# Altium PCB NeoLink Basic Main Board.PcbDoc (part 2 of 5)
Units mm, origin at the board's own origin, x right, y up, seen from the top; angles counter-clockwise.
Board outline 70 x 115 mm, 6 copper layers (Top Layer, Layer 2, Layer 3, Layer 4, Layer 5, Bottom Layer), stack 1.148 mm thick; 467 components, 265 nets, 1397 pads, 1169 vias.
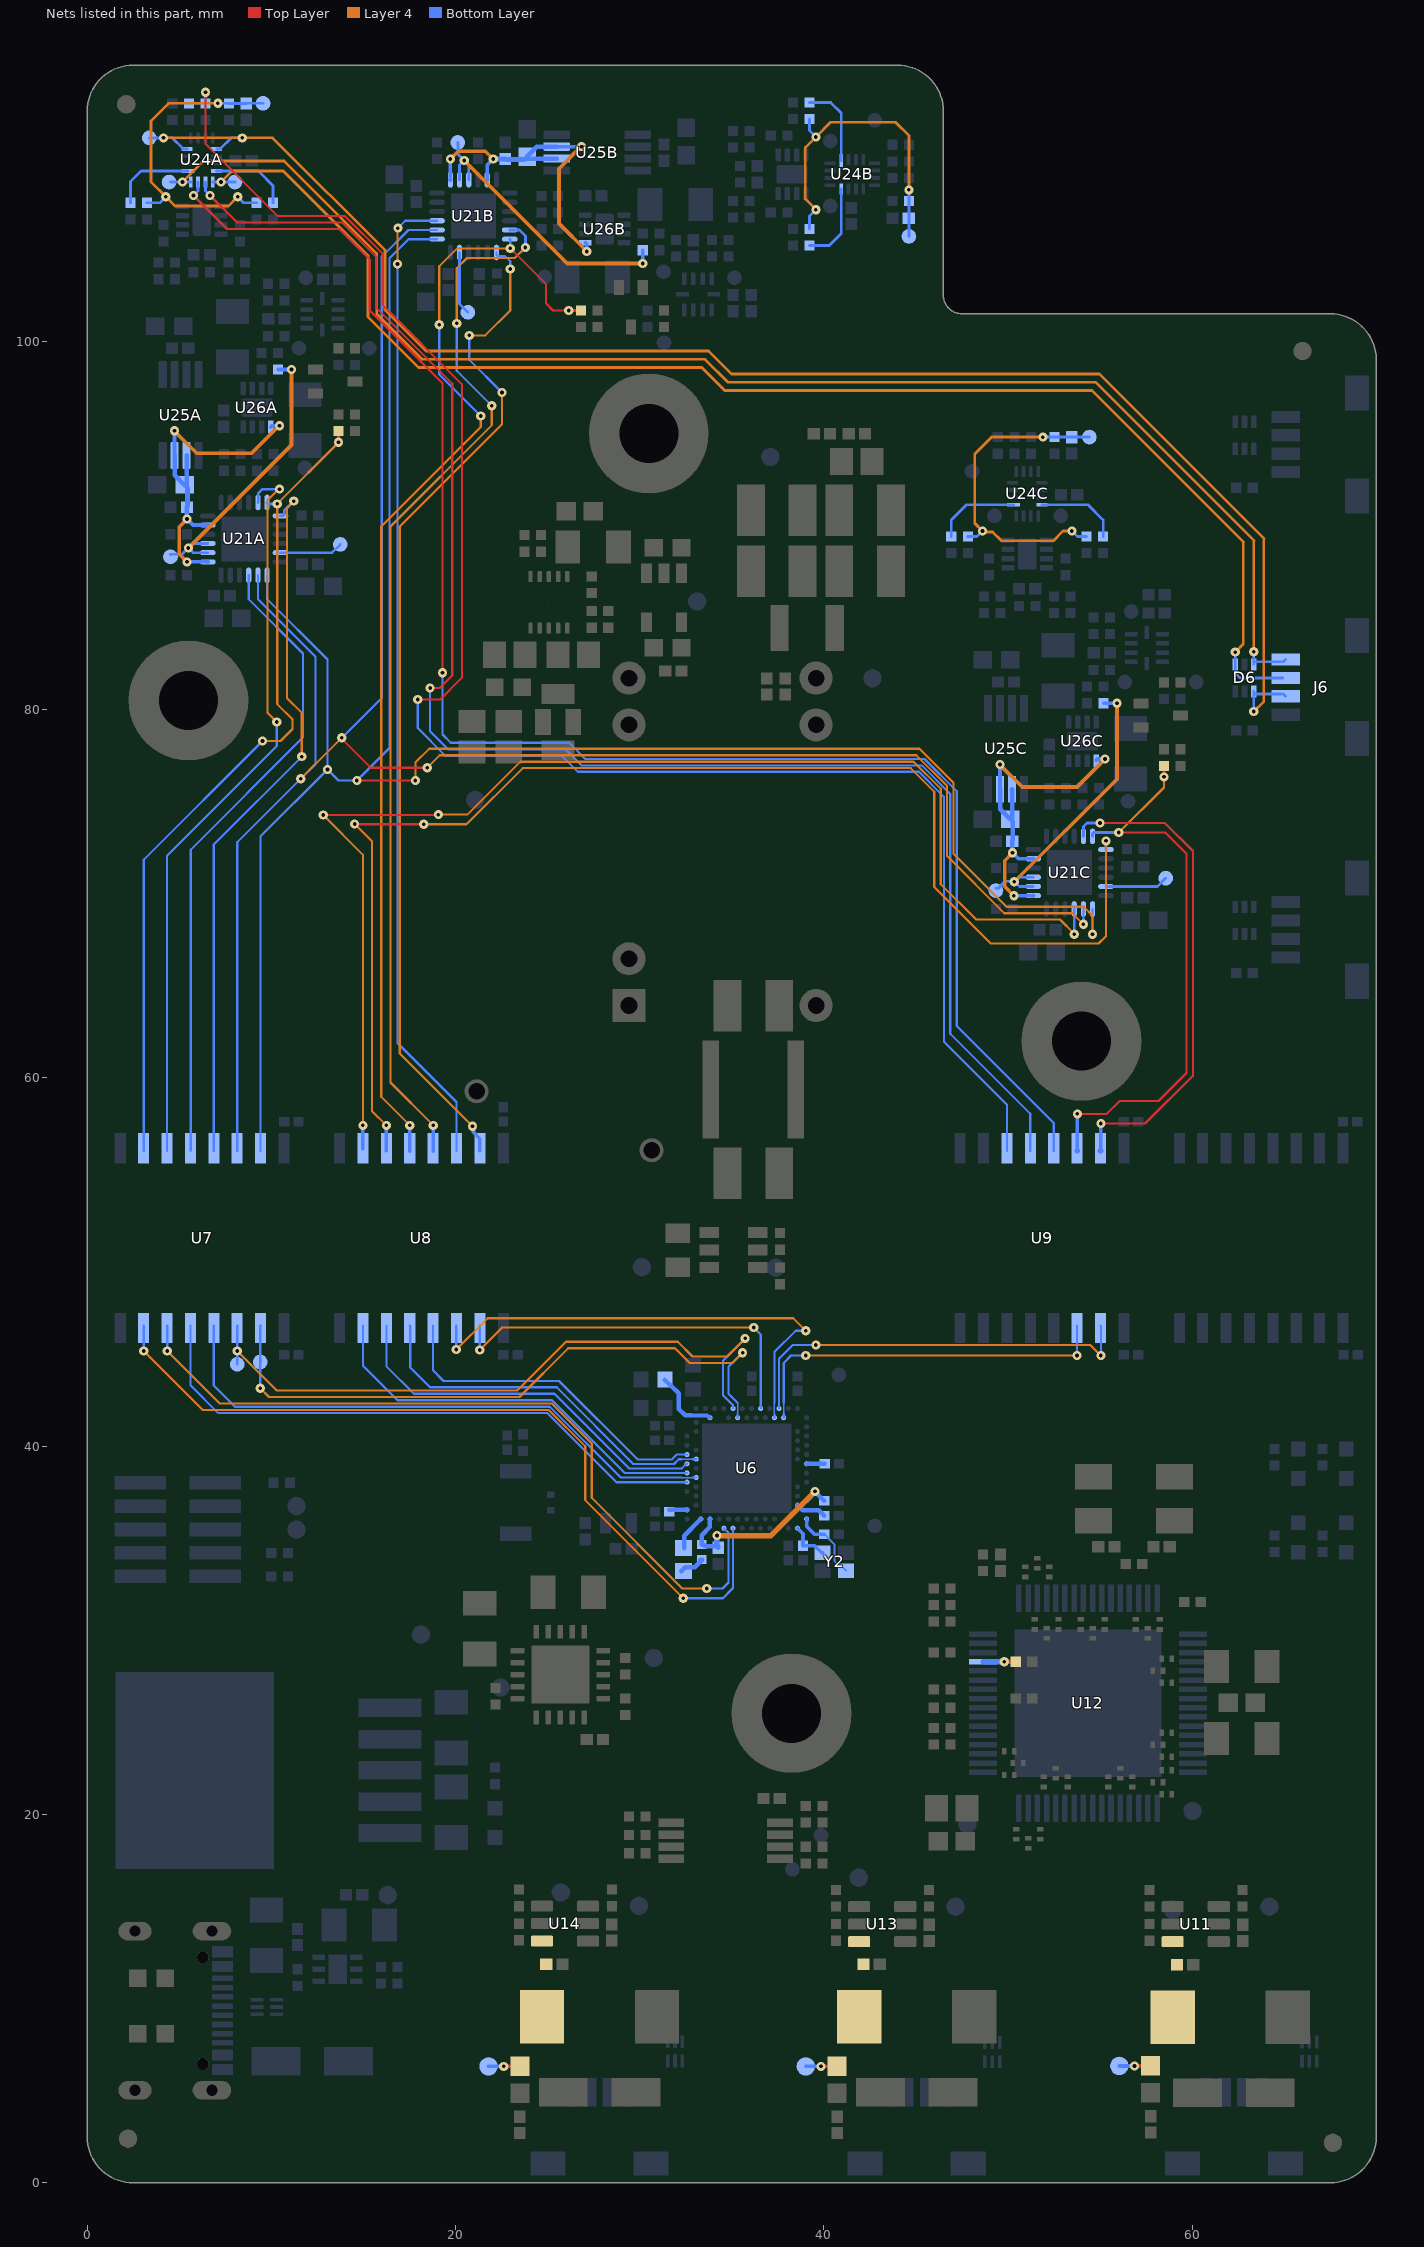
[diagram p6: the nets of this part, all layers, seen from the top]

## Footprints (in the part's own frame and the unit in brackets; to place one, negate y for a bottom-side part, rotate by r counter-clockwise, add the part's x,y. Pads: shape width x height; smd on the part's side, far side on the other; paste and mask are expansions set on the pad) (continued)
"Capgemini Copper Logo - Large" [mm] "Capgemini Copper Logo - Large"
  Top Layer region: 1.841,0.259 1.832,0.259 1.832,0.269 1.841,0.269
  Top Layer region: 1124 vertices and 0 holes, not listed, extent -2,-1.414 1.832,1.867
  Top Layer region: 733 vertices and 0 holes, not listed, extent -0.626,-1.75 1.916,0.315
  Top Layer pour cut-out: -2.25,-2 2.112,-2 2.112,2.117 -2.25,2.117
ECMF240A100N6 [mm]
  rect 0.7x0.2 smd mask+0.05: 1(-0.525,0.4) 2(-0.525,0) 3(-0.525,-0.4) 4(0.525,-0.4) 5(0.525,0) 6(0.525,0.4)
  silkscreen extent -1.2,0.35 -1.1,0.45, body extent -0.71,-0.72 0.71,0.72, height 0.51
FB-0402-L [mm] "Ferrite Bead/Inductor 0402, IPC High Density"
  rect 0.49x0.52 smd mask+0.05: 1(-0.405,0) 2(0.405,0)
  body extent -0.5,-0.25 0.5,0.25, height 0.5
FB-0603-L [mm] "Ferrite Bead/Inductor 0603, IPC High Density"
  rect 0.86x0.92 smd mask+0.05: 1(-0.625,0) 2(0.625,0)
  body extent -0.8,-0.4 0.8,0.4, height 0.8
FB-0603-N [mm] "Ferrite Bead/Inductor 0603, IPC Medium Density"
  rect 1.06x1.02 smd mask+0.05: 1(-0.725,0) 2(0.725,0)
  body extent -0.8,-0.4 0.8,0.4, height 0.8
FEEDTHROUGH-1206 [mil]
  rect 41.78x71 smd paste+0 mask+1.97: 1(-59.89,0) 3(59.89,0)
  rect 55x33.78 smd paste+0 mask+1.97: 2(0,-32.39) 4(0,32.39)
  silkscreen extent -103,-49 67,49, body extent -91,-55 91,55, height 10
FIDUCIAL-1MM [mm] "Fiducial 1mm"
  round 1 smd paste-0.5 mask+0.5: ""(0,0)
  Top Layer pour cut-out: 1.1,0 1.1,0.108 1.058,0.321 0.975,0.521 0.854,0.701 0.701,0.854 0.521,0.975 0.321,1.058 0.108,1.1 0,1.1 -0.108,1.1 -0.321,1.058 -0.521,0.975 -0.701,0.854 -0.854,0.701 -0.975,0.521 -1.058,0.321 -1.1,0.108 -1.1,0 -1.1,-0.108 -1.058,-0.321 -0.975,-0.521 -0.854,-0.701 -0.701,-0.854 -0.521,-0.975 -0.321,-1.058 -0.108,-1.1 0,-1.1 0.108,-1.1 0.321,-1.058 0.521,-0.975 0.701,-0.854 0.854,-0.701 0.975,-0.521 1.058,-0.321 1.1,-0.108 1.1,0
FP-DGK0008A-MFG [mm]
  rrect25% 1.45x0.45 smd paste+0 mask+0.05: 1(-2.2,0.975) 2(-2.2,0.325) 3(-2.2,-0.325) 4(-2.2,-0.975) 5(2.2,-0.975) 6(2.2,-0.325) 7(2.2,0.325) 8(2.2,0.975)
  silkscreen extent -2.32,-1.55 1.1,1.82, body extent -2.45,-1.5 2.45,1.5, height 1.1
FP-DRL0006A-MFG [mm]
  rrect20% 0.66x0.31 smd mask+0.05: 1(-0.735,0.5) 2(-0.735,0) 3(-0.735,-0.5) 4(0.735,-0.5) 5(0.735,0) 6(0.735,0.5)
  silkscreen extent -0.97,0.9 -0.5,0.9, body extent -0.8,-0.8 0.8,0.8, height 0.6
FP-DSC0010J-MFG [mm]
  rrect42% 0.6x0.24 smd paste+0 mask+0.05: 1(-1.4,1) 2(-1.4,0.5) 3(-1.4,0) 4(-1.4,-0.5) 5(-1.4,-1) 6(1.4,-1) 7(1.4,-0.5) 8(1.4,0) 9(1.4,0.5) 10(1.4,1)
  round 0.025 smd paste-2539.97 mask+0.05: 11(0,0)
  silkscreen extent -1.55,-1.55 1.55,1.55, body extent -1.5,-1.5 1.5,1.5, height 0.8
FTSH-105-01-X-DV-K [mm] "Samtec FTSH-105-01-X-DV-K"
  rect 0.74x2.79 smd: 1(-2.54,-2.035) 2(-2.54,2.035) 3(-1.27,-2.035) 4(-1.27,2.035) 5(0,-2.035) 6(0,2.035) 7(1.27,-2.035) 8(1.27,2.035) 9(2.54,-2.035) 10(2.54,2.035)
  silkscreen extent -3.92,-2.13 3.26,1.72, body extent -3.19,-2.96 3.16,2.88, height 6.12
"GCT USB4105-GF-A" [mm] "GCT USB4105-GF-A"
  rect 0.6x1.15 smd mask+0.05: A1_B12(-3.2,4.755) A4_B9(-2.4,4.755) B1_A12(3.2,4.755) B4_A9(2.4,4.755)
  rect 0.3x1.15 smd mask+0.05: A5(-1.25,4.755) A6(-0.25,4.755) A7(0.25,4.755) A8(1.25,4.755) B5(1.75,4.755) B6(0.75,4.755) B7(-0.75,4.755) B8(-1.75,4.755)
  oval 1x2.1 hole 0.6 slot 1.7 at 90 deg mask+0.05: SH1(-4.32,4.18) SH2(4.32,4.18)
  oval 1x1.8 hole 0.6 slot 1.4 at 90 deg mask+0.05: SH3(-4.32,0) SH4(4.32,0)
  round 0.65 hole 0.65 unplated mask+0.05: ""(-2.89,3.68) ""(2.89,3.68)
  silkscreen extent -4.47,-1.95 4.47,6.1, body extent -4.47,-2.6 4.47,5.1, height 3.27
JEDEC-DO-214AC-N [mm] "SMA Diode, IPC Media Density"
  rect 2.65x1.55 smd mask+0.05: A(1.975,0) K(-1.975,0)
  silkscreen extent -3.57,-1.5 2.35,1.5, body extent -2.6,-1.3 2.6,1.3, height 2.9
JEDEC-SOT-23-6-N [mm] "SOT-23-6 (MO-178) (SC-74), IPC Medium Density"
  rect 1.05x0.6 smd mask+0.05: 1(-1.325,0.95) 2(-1.325,0) 3(-1.325,-0.95) 4(1.325,-0.95) 5(1.325,0) 6(1.325,0.95)
  silkscreen extent -1.45,-1.45 0.4,1.92, body extent -1.41,-1.45 1.41,1.45, height 1.46
KTT0005A [mm] "DPAK, 5-Leads, Body 10.65x9.65mm, Pitch 1.7mm, IPC Medium Density"
  rect 1x3.4 smd paste-1.687 mask+0: 1(-3.4,-6.6) 2(-1.7,-6.6) 3(0,-6.6) 4(1.7,-6.6) 5(3.4,-6.6)
  rect 10.7x8.6 smd paste-5.337 mask+0: 6(0,4)
  silkscreen extent -5.34,-6.73 5.34,-0.67, body extent -5.08,-7.65 5.08,7.62, height 4.59
"Label Box, Rectangle, 6mm x 20mm" [mm] "Label Box, Rectangle, 6mm x 20mm"
  silkscreen extent -10.05,-3.05 10.05,3.05
LED-0603-GREEN [mm] "LED, 0603, Green"
  rect 0.8x0.8 smd mask+0.05: A(-0.8,0) K(0.8,0)
  silkscreen extent 0.8,-0.7 1.5,0.7, body extent -0.8,-0.4 0.8,0.4, height 1
LQW32-1210 [mm] "Murata Electronics LQW32 1210"
  rect 1x2.5 smd mask+0.05: 1(-1.5,0) 2(1.5,0)
  silkscreen extent -0.6,-1.25 0.6,1.25, body extent -1.6,-1.25 1.6,1.25, height 2.3
MLCC-0201-N [mm] "Ceramic Capacitor 0201, IPC Medium Density"
  rect 0.25x0.35 smd mask+0.05: 1(-0.275,0) 2(0.275,0)
  body extent -0.3,-0.15 0.3,0.15, height 0.3
MLCC-0402-L [mm] "Ceramic Capacitor 0402, IPC High Density"
  rect 0.56x0.52 smd mask+0.05: 1(-0.39,0) 2(0.39,0)
  body extent -0.5,-0.25 0.5,0.25, height 0.55
MLCC-0402-N [mm] "Ceramic Capacitor 0402, IPC Medium Density"
  rect 0.66x0.62 smd mask+0.05: 1(-0.44,0) 2(0.44,0)
  body extent -0.5,-0.25 0.5,0.25, height 0.55
MLCC-0603-L [mm] "Ceramic Capacitor 0603, IPC HIgh Density"
  rect 0.8x0.85 smd mask+0.05: 1(-0.65,0) 2(0.65,0)
  body extent -0.8,-0.4 0.8,0.4, height 0.9
MLCC-0603-N [mm] "Ceramic Capacitor 0603, IPC Medium Density"
  rect 1x0.95 smd mask+0.05: 1(-0.75,0) 2(0.75,0)
  body extent -0.8,-0.4 0.8,0.4, height 0.9
MLCC-0805-N [mm] "Ceramic Capacitor 0805, IPC Medium Density"
  rect 1.25x1.45 smd mask+0.05: 1(-0.825,0) 2(0.825,0)
  body extent -1,-0.62 1,0.63, height 1.35
MLCC-1206-N [mm] "Ceramic Capacitor 1206, IPC Medium Density"
  rect 1.35x1.8 smd mask+0.05: 1(-1.375,0) 2(1.375,0)
  silkscreen extent -0.3,-0.8 0.3,0.8, body extent -1.6,-0.8 1.6,0.8, height 1.8
MLCC-1210-N [mm] "Ceramic Capacitor 1210, IPC Medium Density"
  rect 1.5x2.8 smd mask+0.05: 1(-1.4,0) 2(1.4,0)
  silkscreen extent -0.25,-1.3 0.25,1.3, body extent -1.6,-1.25 1.6,1.25, height 2.8
NRF52840-QIAA [mm] "Nordic Semiconductor NRF52840-QIAA"
  round 0.275 smd paste+0.012 mask+0.05: A8(-1.25,3.25) A10(-0.75,3.25) A12(-0.25,3.25) A14(0.25,3.25) A16(0.75,3.25) A18(1.25,3.25) A20(1.75,3.25) A22(2.25,3.25) A23(2.75,3.25) AA24(3.25,-2.25) AB2(-2.75,-2.5) AC5(-2,-2.75) AC9(-1,-2.75) AC11(-0.5,-2.75) AC13(0,-2.75) AC15(0.5,-2.75) AC17(1,-2.75) AC19(1.5,-2.75) AC21(2,-2.75) AC24(3.25,-2.75) AD2(-2.75,-3.25) AD4(-2.25,-3.25) AD6(-1.75,-3.25) AD8(-1.25,-3.25) AD10(-0.75,-3.25) AD12(-0.25,-3.25) AD14(0.25,-3.25) AD16(0.75,-3.25) AD18(1.25,-3.25) AD20(1.75,-3.25) AD22(2.25,-3.25) AD23(2.75,-3.25) B1(-3.25,2.75) B3(-2.5,2.75) B5(-2,2.75) B7(-1.5,2.75) B9(-1,2.75) B11(-0.5,2.75) B13(0,2.75) B15(0.5,2.75) B17(1,2.75) B19(1.5,2.75) B24(3.25,2.75) C1(-3.25,2.25) D2(-2.75,2) D23(2.75,2) E24(3.25,1.75) F2(-2.75,1.5) F23(2.75,1.5) G1(-3.25,1.25) H2(-2.75,1) H23(2.75,1) J1(-3.25,0.75) J24(3.25,0.75) K2(-2.75,0.5) L1(-3.25,0.25) L24(3.25,0.25) M2(-2.75,0) N1(-3.25,-0.25) N24(3.25,-0.25) P2(-2.75,-0.5) P23(2.75,-0.5) R1(-3.25,-0.75) R24(3.25,-0.75) T2(-2.75,-1) T23(2.75,-1) U1(-3.25,-1.25) U24(3.25,-1.25) V23(2.75,-1.5) W1(-3.25,-1.75) W24(3.25,-1.75) Y2(-2.75,-2) Y23(2.75,-2)
  rect 4.85x4.85 smd paste-2539.97 mask+0.05: EP(0,0)
  silkscreen extent -3.55,-3.55 3.55,3.55, body extent -3.5,-3.5 3.5,3.5, height 0.85
PAP0064M [mm]
  rect 1.5x0.3 smd paste+0 mask+0.05: 1(-5.7,3.75) 2(-5.7,3.25) 3(-5.7,2.75) 4(-5.7,2.25) 5(-5.7,1.75) 6(-5.7,1.25) 7(-5.7,0.75) 8(-5.7,0.25) 9(-5.7,-0.25) 10(-5.7,-0.75) 11(-5.7,-1.25) 12(-5.7,-1.75) 13(-5.7,-2.25) 14(-5.7,-2.75) 15(-5.7,-3.25) 16(-5.7,-3.75) 33(5.7,-3.75) 34(5.7,-3.25) 35(5.7,-2.75) 36(5.7,-2.25) 37(5.7,-1.75) 38(5.7,-1.25) 39(5.7,-0.75) 40(5.7,-0.25) 41(5.7,0.25) 42(5.7,0.75) 43(5.7,1.25) 44(5.7,1.75) 45(5.7,2.25) 46(5.7,2.75) 47(5.7,3.25) 48(5.7,3.75)
  rect 0.3x1.5 smd paste+0 mask+0.05: 17(-3.75,-5.7) 18(-3.25,-5.7) 19(-2.75,-5.7) 20(-2.25,-5.7) 21(-1.75,-5.7) 22(-1.25,-5.7) 23(-0.75,-5.7) 24(-0.25,-5.7) 25(0.25,-5.7) 26(0.75,-5.7) 27(1.25,-5.7) 28(1.75,-5.7) 29(2.25,-5.7) 30(2.75,-5.7) 31(3.25,-5.7) 32(3.75,-5.7) 49(3.75,5.7) 50(3.25,5.7) 51(2.75,5.7) 52(2.25,5.7) 53(1.75,5.7) 54(1.25,5.7) 55(0.75,5.7) 56(0.25,5.7) 57(-0.25,5.7) 58(-0.75,5.7) 59(-1.25,5.7) 60(-1.75,5.7) 61(-2.25,5.7) 62(-2.75,5.7) 63(-3.25,5.7) 64(-3.75,5.7)
  rect 8x8 smd paste-3.987 mask-3.988: 65(0,0)
  silkscreen extent -7.07,-4.99 5,4.99, body extent -6.02,-6.02 6.02,6.02, height 1.1
PCB-MH-M3-LF-PH [mm] "PCB Mounting Hole, M3, Loose Fit, Pan Head"
  round 6.5 hole 3.2 mask+0.05: MH(0,0)
RES-0402-N [mm] "Resistor 0402, IPC Medium Density"
  rect 0.55x0.55 smd mask+0.05: 1(-0.45,0) 2(0.45,0)
  body extent -0.5,-0.25 0.5,0.25, height 0.4
RES-0603-N [mm] "Resistor 0603, IPC Medium Density"
  rect 0.95x0.95 smd mask+0.05: 1(-0.75,0) 2(0.75,0)
  body extent -0.8,-0.4 0.8,0.4, height 0.45
RES-0805-N [mm] "Resistor 0805, IPC Medium Density"
  rect 1.05x1.35 smd mask+0.05: 1(-0.925,0) 2(0.925,0)
  silkscreen extent -0.1,-0.58 0.1,0.57, body extent -1,-0.63 1,0.62, height 0.6
RGW0020A_V [mm] "QFN, 20-Leads, Body 5x5mm, Pitch 0.65mm, Thermal Pad 3.15x3.15mm, TI Recommended"
  rrect33% 0.75x0.3 smd mask+0.05: 1(-2.325,1.3) 2(-2.325,0.65) 3(-2.325,0) 4(-2.325,-0.65) 5(-2.325,-1.3) 11(2.325,-1.3) 12(2.325,-0.65) 13(2.325,0) 14(2.325,0.65) 15(2.325,1.3)
  rrect33% 0.3x0.75 smd mask+0.05: 6(-1.3,-2.325) 7(-0.65,-2.325) 8(0,-2.325) 9(0.65,-2.325) 10(1.3,-2.325) 16(1.3,2.325) 17(0.65,2.325) 18(0,2.325) 19(-0.65,2.325) 20(-1.3,2.325)
  rrect3% 3.15x3.15 smd paste-1.575 mask+0.05: 21(0,0)
  silkscreen extent -2.73,-2.73 2.73,2.73, body extent -2.57,-2.57 2.58,2.57, height 1.01
RSV0016A-MFG [mm]
  rrect20% 0.7x0.2 smd mask+0.05: 1(-0.75,0.6)
  rrect20% 0.6x0.2 smd mask+0.05: 2(-0.8,0.2) 3(-0.8,-0.2) 4(-0.8,-0.6) 9(0.8,-0.6) 10(0.8,-0.2) 11(0.8,0.2) 12(0.8,0.6)
  rrect20% 0.2x0.6 smd mask+0.05: 5(-0.6,-1.2) 6(-0.2,-1.2) 7(0.2,-1.2) 8(0.6,-1.2) 13(0.6,1.2) 14(0.2,1.2) 15(-0.2,1.2) 16(-0.6,1.2)
  silkscreen extent -1.45,0.55 -1.35,0.65, body extent -0.9,-1.3 0.9,1.3, height 0.56
SM04B-SRSS-TB(LF)(SN) [mil] "Connector Header Surface Mount, Right Angle 4 position 0.039\" (1.00mm)"
  rect 26x61 smd paste+0 mask+1.97: 1(59.06,-82.62) 2(19.68,-82.62) 3(-19.68,-82.62) 4(-59.06,-82.62)
  rect 75x51 smd paste+0 mask+1.97: 5(-110.24,69.94) 6(110.24,69.94)
  silkscreen extent -123,-135 123,31, body extent -118,-98 118,97, height 117
SOD-923 [mm] "SOD-923 Combined"
  rect 0.36x0.4 smd mask+0.05: A(0.42,0) K(-0.42,0)
  silkscreen extent -0.9,-0.3 -0.9,0.3, body extent -0.5,-0.3 0.5,0.3, height 0.4
SON50P200X200X80-9N [mm] "WSON - 0.8 mm max height"
  rrect25% 0.7x0.3 smd mask+0.05: 1(-1.05,0.75) 2(-1.05,0.25) 3(-1.05,-0.25) 4(-1.05,-0.75) 5(1.05,-0.75) 6(1.05,-0.25) 7(1.05,0.25) 8(1.05,0.75)
  rrect25% 1x1.7 smd mask+0.05: 9(0,0)
  silkscreen extent -1.52,1.28 -1.27,1.52, body extent -1,-1 1,1, height 0.77
SON65P200X200X80-7N [mm]
  rrect20% 0.69x0.32 smd mask+0.05: 1(-1.02,0.65) 2(-1.02,0) 3(-1.02,-0.65) 4(1.02,-0.65) 5(1.02,0) 6(1.02,0.65)
  rect 1x1.6 smd paste-2 mask+0.05: 7(0,0)
  silkscreen extent -1.9,-1.13 1,1.13, body extent -1,-1 1,1, height 0.8
SOT95P280X145-6N [mm]
  rrect25% 1.2x0.6 smd mask+0.05: 1(-1.25,0.95) 2(-1.25,0) 3(-1.25,-0.95) 4(1.25,-0.95) 5(1.25,0) 6(1.25,0.95)
  silkscreen extent -1.85,-1.45 0.3,1.6, body extent -1.4,-1.45 1.4,1.45, height 1.2
SOT-23-5-N [mm] "SOT-23-5, IPC Medium Density"
  rect 1.05x0.6 smd mask+0.05: 1(-1.325,0.95) 2(-1.325,0) 3(-1.325,-0.95) 4(1.325,-0.95) 5(1.325,0.95)
  silkscreen extent -1.45,-1.45 0.4,1.93, body extent -1.4,-1.45 1.4,1.45, height 1.45
SOT-323-N [mm] "SOT-323, IPC Medium Density"
  rect 0.8x0.55 smd mask+0.05: 1(-1.075,0.65) 2(-1.075,-0.65) 3(1.075,0)
  silkscreen extent -1.2,-1.1 0.67,1.6, body extent -1.05,-1 1.05,1, height 1.05
T495D [mm]
  rect 2.4x2.9 smd mask+0.05: 1(-3.125,0) 2(3.125,0)
  silkscreen extent -4.82,-2.15 3.65,2.15, body extent -3.8,-2.3 3.8,2.3, height 3.12
THS4536RUNR [mm] "WQFN 10 Pins - 0.8 mm max height"
  rrect25% 0.7x0.25 smd mask+0.05: 1(-0.85,0.775) 2(-0.85,0.275) 3(-0.85,-0.225) 4(-0.85,-0.725) 6(0.85,-0.725) 7(0.85,-0.225) 8(0.85,0.275) 9(0.85,0.775)
  rrect25% 0.25x0.7 smd mask+0.05: 5(0,-0.825) 10(0,0.875)
  silkscreen extent -1.7,0.68 -1.5,0.87, body extent -1,-0.98 1,1.03, height 0.9
"TI SOIC-16 ISOLATED" [mm] "TI SOIC-16 8.1mm clearance"
  rect 1.65x0.6 smd: 1(-4.875,4.445) 2(-4.875,3.175) 3(-4.875,1.905) 4(-4.875,0.635) 5(-4.875,-0.635) 6(-4.875,-1.905) 7(-4.875,-3.175) 8(-4.875,-4.445) 9(4.875,-4.445) 10(4.875,-3.175) 11(4.875,-1.905) 12(4.875,-0.635) 13(4.875,0.635) 14(4.875,1.905) 15(4.875,3.175) 16(4.875,4.445)
  silkscreen extent -4.87,-5.25 3.4,5.42, body extent -5.15,-5.25 5.15,5.25, height 2.65
TI-RGE24-2450X2450TP_V [mm] "QFN, 24-Leads, Body 4x4mm, Pitch 0.5mm, Thermal Pad 2.45x2.45mm"
  oval 0.85x0.28 smd mask+0.05: 1(-1.975,1.25) 2(-1.975,0.75) 3(-1.975,0.25) 4(-1.975,-0.25) 5(-1.975,-0.75) 6(-1.975,-1.25) 13(1.975,-1.25) 14(1.975,-0.75) 15(1.975,-0.25) 16(1.975,0.25) 17(1.975,0.75) 18(1.975,1.25)
  oval 0.28x0.85 smd mask+0.05: 7(-1.25,-1.975) 8(-0.75,-1.975) 9(-0.25,-1.975) 10(0.25,-1.975) 11(0.75,-1.975) 12(1.25,-1.975) 19(1.25,1.975) 20(0.75,1.975) 21(0.25,1.975) 22(-0.25,1.975) 23(-0.75,1.975) 24(-1.25,1.975)
  rect 2.45x2.45 smd mask+0.05: 25(0,0)
  silkscreen extent -2.85,-2.07 2.07,2.07, body extent -2,-2 2,2, height 1
"TIM 2-0911" [mm] "Traco Power TIM 2-0911"
  rect 1.8x1.8 hole 0.9 mask+0.05: 1(0,0)
  round 1.8 hole 0.9 mask+0.05: 2(2.54,0) 7(15.24,0) 8(17.78,0) 9(17.78,10.16) 10(15.24,10.16) 16(0,10.16)
  silkscreen extent -3.2,-3.1 21.1,12.26, body extent -3.18,-2.12 21.07,12.23, height 10.82
TL1017AAAF260QG [mm] "E-Switch TL1017AAAF260QG"
  rect 0.8x1.7 smd mask+0.05: 1(-1.7,0) 2(1.7,0)
  silkscreen extent -1.5,-1.25 1.5,1.25, body extent -2,-1.25 2,1.25, height 1.5
TP-0.8mm [mm] "Test Point 0.8mm"
  round 0.8 smd paste-0.4 mask-0.1: 1(0,0)
TP-1.0mm#1 [mm] "Test Point 1.0mm"
  round 1 smd paste-0.5 mask-0.1: 1(0,0)
TP-1.0mm#2 [mm] "Test Point 1.0mm"
  round 1 smd far side paste-0.5 mask-0.1: 1(0,0)
TSSOP-8-N [mm] "TSSOP-8, IPC Medium Density"
  rect 1.4x0.45 smd mask+0.05: 1(-2.95,0.975) 2(-2.95,0.325) 3(-2.95,-0.325) 4(-2.95,-0.975) 5(2.95,-0.975) 6(2.95,-0.325) 7(2.95,0.325) 8(2.95,0.975)
  silkscreen extent -3.07,-1.55 1.85,1.87, body extent -3.2,-1.55 3.2,1.55, height 1.2
XTAL-2.0x1.2 [mm] "Crystal - 2.0mm x 1.2mm"
  rect 0.6x1.1 smd mask+0.05: 1(-0.7,0) 2(0.7,0)
  silkscreen extent -1.1,1 -1,1.1, body extent -1,-0.6 1,0.6, height 0.6
XTAL-2.0x1.6 [mm] "Crystal - 2.0mm x 1.6mm"
  rect 0.875x0.775 smd mask+0.05: 1(0.637,0.487) 2(-0.637,0.487) 3(-0.637,-0.487) 4(0.637,-0.487)
  silkscreen extent 1,1.2 1.1,1.3, body extent -1,-0.8 1,0.8, height 0.6
XTAL-5.0x3.2-ECS [mm] "Crystal - 5.0mm x 3.2mm, ECS ECX-53B Series"
  rect 2x1.4 smd mask+0.05: 1(-2.2,-1.2) 2(2.2,-1.2) 3(2.2,1.2) 4(-2.2,1.2)
  silkscreen extent -3.8,-1.6 0.8,1.6, body extent -2.5,-1.6 2.5,1.6, height 0.85

## Part data
C1 C2 C5 C6 C7 C8: library part CMP-0000000898-3, "CAP-CER-22uF-25V-1210-X7R-20%", Dielectric=X7R, Tolerance=20%, Voltage=25V
C3 C4 C10 C11 C22 C26 C27 C30 C31 C32 C33 C34 C35 C36 C39 C40 C41 C42 C43 C44 C48 C56 C57 C60 C61 C63 C64 C65 C102 C105 C106 C107 C108 C109A C109B C109C C111A C111B C111C C113A C113B C113C C116A C116B C116C C118A C118B C118C C121A C121B C121C C122A C122B C122C C124A C124B C124C C125A C125B C125C: library part CMP-0000000712-3, "CAP-CER-100nF-50V-0402-X7R-10%", Dielectric=X7R, Tolerance=10%, Voltage=50V
C9 C66: library part CMP-0000001064-2, "CAP-CER-1uF-50V-0805-X7R-10%", Dielectric=X7R, Tolerance=10%, Voltage=50V
C12 C13 C15 C23 C24 C79 C92 C103 C104: library part CMP-0000002231-1, "CAP-CER-10uF-50V-1206-X7R-10%", Dielectric=X7R, Tolerance=10%, Voltage=50V
C14: library part CMP-0000003462-3, "CAP-FEEDTHROUGH-27uF-6.3V-1206", Dielectric=X7R, Tolerance=20%, Voltage=6.3V
C16 C17 C18: library part CMP-0000002045-2, "CAP-CER-10uF-16V-0805-X7R-10%", Dielectric=X7R, Tolerance=10%, Voltage=16V
C19: library part CMP-0000003284-1, "CAP-CER-4.7uF-50V-0805-X7R-20%", Dielectric=X7R, Tolerance=20%, Voltage=50V
C20 C21: library part CMP-0000000632-4, "CAP-CER-1uF-25V-0603-X7R-10%", Dielectric=X7R, Tolerance=10%, Voltage=25V
C25: library part CMP-0000000732-3, "CAP-CER-1nF-50V-0402-X7R-5%", Dielectric=X7R, Tolerance=5%, Voltage=50V
C28 C29 C37 C45: library part CMP-0000000721-3, "CAP-CER-12pF-50V-0402-NP0-5%", Dielectric="C0G, NP0", Tolerance=5%, Voltage=50V
C38 C51 C52: library part CMP-0000000635-4, "CAP-CER-4.7uF-6.3V-0603-X7R-10%", Dielectric=X7R, Tolerance=10%, Voltage=6.3V
C46 C58 C123A C123B C123C: library part CMP-0000002778-1, "CAP-CER-1uF-10V-0402-X7R-10%", Dielectric=X7R, Tolerance=10%, Voltage=10V
C47: library part CMP-0000000775-3, "CAP-CER-47nF-50V-0402-X7R-10%", Dielectric=X7R, Tolerance=10%, Voltage=50V
C49: library part CMP-0000000714-3, "CAP-CER-100pF-50V-0402-NP0-5%", Dielectric="C0G, NP0", Tolerance=5%, Voltage=50V
C50: library part CMP-0000000798-3, "CAP-CER-820pF-50V-0402-NP0-5%", Dielectric="C0G, NP0", Tolerance=5%, Voltage=50V
C53 C59 C62: library part CMP-0000003482-3, "CAP-TANT-150uF-10V-10%-2917", Manufacturer=KEMET, Temperature (Max)=125, Temperature (Min)=-55, Tolerance=10%, Voltage=10V, ComponentLink1Description=Datasheet, ComponentLink1URL=https://yageogroup.com/content/datasheet/asset/file/KEM_T2009_T495, ESR="100 mOhm", Manufacturer Part Number=T495D157K010ATE100, Type=TANTALUM
C54 C55: library part CMP-0000000730-3, "CAP-CER-18pF-50V-0402-NP0-5%", Dielectric="C0G, NP0", Tolerance=5%, Voltage=50V
C67 C70 C73 C76 C80 C83 C86 C89 C93 C96 C99: library part CMP-0000003428-2, "CAP-CER-1.0nF-10V-0201-X7R-10%", Dielectric=X7R, Tolerance=10%, Voltage=10V
C68 C71 C74 C77 C81 C84 C87 C90 C94 C97 C100: library part CMP-0000003392-1, "CAP-CER-10nF-16V-0201-X7R-10%", Dielectric=X7R, Tolerance=10%, Voltage=16V
C69 C72 C75 C78 C82 C85 C88 C91 C95 C98 C101: library part CMP-0000003381-1, "CAP-CER-100nF-16V-0201-X7R-10%", Dielectric=X7R, Tolerance=10%, Voltage=16V
C110A C110B C110C C112A C112B C112C C115A C115B C115C C119A C119B C119C: library part CMP-0000000636-4, "CAP-CER-10uF-6.3V-0603-X7R-20%", Dielectric=X7R, Tolerance=20%, Voltage=6.3V
C114A C114B C114C: library part CMP-0000001996-1, "CAP-CER-100nF-50V-1206-NP0-5%", Dielectric="C0G, NP0", Tolerance=5%, Voltage=50V
C117A C117B C117C: library part CMP-0000002076-1, "CAP-CER-47nF-50V-1206-NP0-1%", Dielectric="C0G, NP0", Tolerance=1%, Voltage=50V
C120A C120B C120C: library part CMP-0000000731-3, "CAP-CER-1nF-50V-0402-NP0-5%", Dielectric="C0G, NP0", Tolerance=5%, Voltage=50V
C126: library part CMP-0000003659-2, "CAP-SAFETY-330pF-760VAC-RADIAL-9.5mm", Dielectric=X7R, Tolerance=10%, Voltage=760VAC, ComponentLink1Description=Datasheet, ComponentLink1URL=https://www.vishay.com/docs/23102/440lseries.pdf
C127A C127B C127C: library part CMP-0000000746-3, "CAP-CER-22pF-50V-0402-NP0-5%", Dielectric="C0G, NP0", Tolerance=5%, Voltage=50V
D1: library part CMP-0000001898-5, "DIODE-TVS-5V-SZESD9101P2T5G", Current=16A, Manufacturer=onsemi, Voltage - Breakdown=5.3V, Voltage - Clamping=7V, Voltage - Reverse=5V, ComponentLink1Description=Datasheet, ComponentLink1URL=https://www.onsemi.com/pdf/datasheet/esd9101-d.pdf, Manufacturer Part Number=SZESD9101P2T5G, Type=TVS
D2 D3 D4 D5: library part CMP-0000002064-3, "DIODE-TVS-6V-SMAJ6.0A", Current=38.8A, Manufacturer="Diodes Incorporated", Manufacturer Part Number=SMAJ6.0A-13-F, Voltage - Reverse=6V, ComponentLink1Description=Datasheet, ComponentLink1URL=https://www.diodes.com/assets/Datasheets/SMAJ5.0CA-SMAJ200CA.pdf, Type=TVS
D6 D7 D8: library part CMP-0000003522-1, "DIODE-ESD-5.5V-TPD4E1B06DRLR", Current=N/A, Manufacturer="Texas Instruments", Voltage - Reverse=5.5V, ComponentLink1Description=Datasheet, ComponentLink1URL=https://www.ti.com/general/docs/suppproductinfo.tsp?distId=10&gotoUrl=https%3A%2F%2Fwww.ti.com%2Flit%2Fgpn%2Ftpd4e1b06, Manufacturer Part Number=TPD4E1B06DRLR, Type="ESD Diode Array"
FB1 FB2 FB3 FB4 FB5 FB6: library part CMP-00084-3, "FB-220R@100MHz-2000mA-50mR-BLM18EG221SN1D", Current=2000mA, Manufacturer="Murata Electronics", Tolerance=25%, ComponentLink1Description=Datasheet, ComponentLink1URL=https://www.murata.com/en-us/products/productdata/8796747366430/ENFA0021.pdf, ESR=50mR, Manufacturer Part Number=BLM18EG221SN1D
FD1 FD2 FD3 FD4 FD5 FD6 FD7 FD8: library part CMP-0000000671-3, "Fiducial"
J1: library part CMP-0000001058-3, "CONN-SAMTEC-FTSH-2x5-FTSH-105-01-LM-DV-K-P-TR", Manufacturer=Samtec, ComponentLink1Description=Datasheet, ComponentLink1URL=https://suddendocs.samtec.com/prints/ftsh-1xx-xx-xxx-dv-xxx-xxx-x-xx-mkt.pdf, Manufacturer Part Number=FTSH-105-01-LM-DV-K-P-TR
J2: library part CMP-0000002859-3, "CONN-GCT-USB-C-USB4105-GF-A", Manufacturer=GCT, ComponentLink1Description=Datasheet, ComponentLink1URL=https://mm.digikey.com/Volume0/opasdata/d220001/medias/docus/5492/USB4105.pdf, Manufacturer Part Number=USB4105-GF-A, Type="USB C"
J3 J4 J5 J6 J7 J8: library part CMP-0000003475-5, "CONN-JST-SR/SZ-1x4-SM04B-SRSS-TB(LF)(SN)", Manufacturer=JST, ComponentLink1Description=Datasheet, ComponentLink1URL=https://au.mouser.com/datasheet/3/1070/1/eSR_SZ.pdf, Manufacturer Part Number=SM04B-SRSS-TB(LF)(SN), Type=Header
L1: library part CMP-00288-1, "IND-6.8uH-1.3A-125mOhm-20%", Current=1.3A, Manufacturer="Würth Elektronik", Manufacturer Part Number=78408053006, Tolerance=±20%, ComponentLink1Description=Datasheet, ComponentLink1URL=https://www.we-online.com/components/products/datasheet/78408053006.pdf, ESR=125mOhm
L2: library part CMP-00289-1, "IND-4.7uH-850mA-280mOhm-20%-3.2x2.5x2.5", Current=850mA, Manufacturer="Murata Electronics", Manufacturer Part Number=LQW32FT4R7M0HL, Tolerance=20%, ESR="280 mOhm"
L3: library part CMP-00010-1, "IND-15nH-450mA-320mOhm-5%-0402", Current="450 mA", Manufacturer="Murata Electronics", Manufacturer Part Number=LQG15HS15NJ02D, Tolerance=±5%, ESR="320 mOhm"
L4: library part CMP-00001-4, "IND-10uH-80mA-360mOhm-20%-0603", Current="80 mA", Manufacturer="Taiyo Yuden", Manufacturer Part Number=LBMF1608T100M, Tolerance=±20%, ESR="360 mOhm"
LABEL1: library part CMP-0000002854-5, Manufacturer=N/A, Manufacturer Part Number=N/A
LD1 LD2 LD3 LD4 LD5: library part CMP-0000001161-5, "LED-GREEN-150060GS75000", Colour=Green, Forward Current=20mA, Forward Voltage=3.2V, Manufacturer="Wurth Elektronik", ComponentLink1Description=Datasheet, ComponentLink1URL=https://au.mouser.com/datasheet/2/445/150060GS75000-1714120.pdf, Manufacturer Part Number=150060GS75000
LOGO1: library part CMP-0000003196-9, Manufacturer=N/A, Manufacturer Part Number=N/A
MH1 MH2 MH3 MH4: library part CMP-0000002988-3
Q1: library part CMP-0000001263-4, "MOSFET-N/P-20V-3.4A/2.5A-AO6604", Current=3.4A/2.5A, Manufacturer="Alpha & Omega", Voltage=20V, Datasheet=http://www.aosmd.com/res/data_sheets/AO6604.pdf, Manufacturer Part Number=AO6604, PartId=1, Rds On=65mR, Type="N and P-Channel Complementary"
Q2A Q2B Q2C: library part CMP-0000002125-8, "MOSFET-N-60V-320mA-BSS138PW,115", Current=320mA, Manufacturer=Nexperia, Voltage=60V, Datasheet=https://assets.nexperia.com/documents/data-sheet/BSS138PW.pdf, Manufacturer Part Number=BSS138PW,115, Rds On="1.6 Ohms @ Vgs=10V", Type="N Channel"
R1: library part CMP-0000002324-2, "RES-1K-0805-1%-125mW", Power=125mW, Tolerance=1%
R2 R5 R8 R9 R15 R38 R51 R61A R61B R61C R63A R63B R63C R64A R64B R64C R68A R68B R68C R69A R69B R69C: library part CMP-0000001609-1, "RES-10K-0402-1%-100mW", Power=100mW, Tolerance=1%
R3: library part CMP-0000001438-1, "RES-330-0402-1%-100mW", Power=100mW, Tolerance=1%
R4A R4B R4C R6 R14 R19A R19B R19C R34 R39 R40 R42: library part CMP-0000001723-1, "RES-100K-0402-1%-100mW", Power=100mW, Tolerance=1%
R7: library part CMP-0000001822-1, "RES-732K-0402-1%-100mW", Power=100mW, Tolerance=1%
R10: library part CMP-0000001688-1, "RES-49.9K-0402-1%-100mW", Power=100mW, Tolerance=1%
R11: library part CMP-0000000378-1, "RES-22K-0603-1%-100mW", Power=100mW, Tolerance=1%
R12: library part CMP-0000001524-1, "RES-1.87K-0402-1%-100mW", Power=100mW, Tolerance=1%
R13: library part CMP-0000001574-1, "RES-4.99K-0402-1%-100mW", Power=100mW, Tolerance=1%
R16 R17 R22 R23: library part CMP-0000000864-1, "RES-1K-0402-1%-100mW", Power=100mW, Tolerance=1%
R18A R18B R18C: library part CMP-0000001417-1, "RES-220-0402-1%-100mW", Power=100mW, Tolerance=1%
R20A R20B R20C R21A R21B R21C R24A R24B R24C R65A R65B R65C R70A R70B R70C R73A R73B R73C R85A R85B R85C R99 R100 R101: library part CMP-0000000811-2, "RES-0-0402-JUMPER-100mW", Power=100mW, Tolerance=Jumper
R28 R31 R32: library part CMP-0000001303-1, "RES-22-0402-1%-100mW", Power=100mW, Tolerance=1%
R33 R75A R75B R75C R81A R81B R81C: library part CMP-0000001837-2, "RES-1M-0402-1%-100mW", Power=100mW, Tolerance=1%
R35 R41 R43: library part CMP-0000001691-1, "RES-52.3K-0402-1%-100mW", Power=100mW, Tolerance=1%
R36: library part CMP-0000001607-1, "RES-9.53K-0402-1%-100mW", Power=100mW, Tolerance=1%
R37: library part CMP-0000001718-1, "RES-90.9K-0402-1%-100mW", Power=100mW, Tolerance=1%
R44 R45 R46 R47 R48 R49 R50 R93 R94 R95 R96 R97 R98: library part CMP-0000001571-1, "RES-4.7K-0402-1%-100mW", Power=100mW, Tolerance=1%
R52 R53 R54 R55: library part CMP-0000001499-1, "RES-1.1K-0402-1%-100mW", Power=100mW, Tolerance=1%
R56 R60: library part CMP-0000001775-1, "RES-300K-0402-1%-100mW", Power=100mW, Tolerance=1%
R57: library part CMP-0000001685-1, "RES-47K-0402-1%-100mW", Power=100mW, Tolerance=1%
R58 R59: library part CMP-0000000308-1, "RES-5.1K-0603-1%-100mW", Power=100mW, Tolerance=1%
R66A R66B R66C R67A R67B R67C R79A R79B R79C R84A R84B R84C: library part CMP-0000003492-1, "RES-1K-0402-0.1%-100mW", Power=100mW, Tolerance=0.1%
R71A R71B R71C R76A R76B R76C R83A R83B R83C: library part CMP-0000003496-1, "RES-200-0402-0.1%-62.5mW", Power=62.5mW, Tolerance=0.1%
R72A R72B R72C R82A R82B R82C: library part CMP-0000001575-1, "RES-5.1K-0402-1%-100mW", Power=100mW, Tolerance=1%
R74A R74B R74C R80A R80B R80C: library part CMP-0000003579-1, "RES-20.0K-0402-0.1%-63mW", Power=63mW, Tolerance=0.1%
R77A R77B R77C: library part CMP-0000001662-1, "RES-30.1K-0402-1%-100mW", Power=100mW, Tolerance=1%
R78A R78B R78C: library part CMP-0000001637-1, "RES-18.2K-0402-1%-100mW", Power=100mW, Tolerance=1%
R86A R86B R86C: library part CMP-0000001308-1, "RES-24-0402-1%-100mW", Power=100mW, Tolerance=1%
R89A R89B R89C: library part CMP-0000002849-1, "RES-2.49M-0402-1%-100mW", Power=100mW, Tolerance=1%
SW1: library part CMP-0000002876-1, "SWITCH-TACTILE-SPST-NO-3mm x 2.5mm-TL1017AAAF260QG", Manufacturer=E-Switch, Datasheet=https://configured-product-images.s3.amazonaws.com/Datasheets/TL1017.pdf, Manufacturer Part Number=TL1017AAAF260QG
TP1 TP2 TP3 TP4 TP5 TP6 TP7 TP8 TP9 TP10 TP11 TP12 TP13 TP14 TP15 TP16 TP17 TP18 TP19 TP20 TP21 TP22 TP23 TP24 TP25 TP26 TP28 TP29A TP29B TP29C TP30A TP30B TP30C TP31A TP31B TP31C TP32A TP32B TP32C TP33A TP33B TP33C TP34A TP34B TP34C TP35A TP35B TP35C TP36A TP36B TP36C TP37A TP37B TP37C TP38A TP38B TP38C TP39 TP40: library part CMP-0000000822-22, "Test Point, Circular SMT Style"
U1: library part CMP-0000003483-1, "IC-DCDC-ISOLATED-TIM 2-0911", Manufacturer="Traco Power", ComponentLink1Description=Datasheet, ComponentLink1URL=https://www.tracopower.com/products/tim2.pdf, Manufacturer Part Number="TIM 2-0911"
U2: library part CMP-0000003458-2, "IC-LDO-FIXED-3.3V-TPS7A4533KTTR", Current - Output 1=1.5A, Manufacturer="Texas Instruments", Voltage - Input (Max)=20V, Voltage - Input (Min)=2.1V, Voltage - Output 1 (Min/Fixed)=3.3V, Adjustable=No, ComponentLink1Description=Datasheet, ComponentLink1URL=https://www.ti.com/general/docs/suppproductinfo.tsp?distId=10&gotoUrl=http%253A%252F%252Fwww.ti.com%252Flit%252Fgpn%252Ftps7a45, Manufacturer Part Number=TPS7A4533KTTR
U3: library part CMP-0000003461-4, "IC-LDO-ADJ-TPS7A9401DSCR", Current - Output 1=1A, Manufacturer="Texas Instruments", Voltage - Input (Max)=5.7V, Voltage - Input (Min)=1.7V, Voltage - Output 1 (Max)=5.5V, Voltage - Output 1 (Min/Fixed)=0V, Adjustable=Yes, ComponentLink1Description=Datasheet, ComponentLink1URL=https://www.ti.com/lit/ds/symlink/tps7a94.pdf, Manufacturer Part Number=TPS7A9401DSCR
U4: library part CMP-0000001050-5, "IC-LDO-FIXED-3.3V-TLV74033PDBVR", Current - Output 1=300mA, Manufacturer="Texas Instruments", Voltage - Input (Max)=5.5V, Voltage - Input (Min)=1.4V, Voltage - Output 1 (Min/Fixed)=3.3V, Adjustable=No, ComponentLink1Description=Datasheet, ComponentLink1URL=https://www.ti.com/lit/gpn/TLV740P, Manufacturer Part Number=TLV74033PDBVR
U5: library part CMP-0000003460-3, "IC-LDO-ADJ-TPS74801RGWT", Current - Output 1=1.5A, Manufacturer="Texas Instruments", Voltage - Input (Max)=5.5V, Voltage - Input (Min)=0.8V, Voltage - Output 1 (Max)=3.6V, Adjustable=YES, ComponentLink1Description=Datasheet, ComponentLink1URL=https://www.ti.com/general/docs/suppproductinfo.tsp?distId=10&gotoUrl=https%3A%2F%2Fwww.ti.com%2Flit%2Fgpn%2Ftps74801, Manufacturer Part Number=TPS74801RGWT, Voltage - Output 1 (Min/Fixed)=0.8V
U6: library part CMP-0000000638-9, "IC-RF-NRF52840-QIAA", Manufacturer="Nordic Semiconductor ASA", ComponentLink1Description=Datasheet, ComponentLink1URL=https://infocenter.nordicsemi.com/pdf/nRF52840_PS_v1.2.pdf, Manufacturer Part Number=NRF52840-QIAA
U7 U8 U9 U10: library part CMP-0000003489-2, "IC-DIGITAL-ISOLATOR-ISO7760DWR", Manufacturer="Texas Instruments", ComponentLink1Description=Datasheet, ComponentLink1URL=https://www.ti.com/lit/ds/symlink/iso7760.pdf?ts=1712058534565&ref_url=https%253A%252F%252Fwww.ti.com%252Fsitesearch%252Fen-us%252Fdocs%252Funiversalsearch.tsp%253FlangPref%253Den-US%2526searchTerm%253DISO7760DBQR%2526nr%253D9, Manufacturer Part Number=ISO7760DWR
U11 U13 U14: library part CMP-0000003472-2, "IC-PWRSWITCH-1.5A-TPS2553DDBVR", Manufacturer="Texas Instruments", ComponentLink1Description=Datasheet, ComponentLink1URL=https://www.ti.com/general/docs/suppproductinfo.tsp?distId=10&gotoUrl=https%3A%2F%2Fwww.ti.com%2Flit%2Fgpn%2Ftps2552d, Manufacturer Part Number=TPS2553DDBVR
U12: library part CMP-0000003455-3, "IC-INTERFACE-USB-HUB-TUSB4041IPAP", Manufacturer="Texas Instruments", ComponentLink1Description=Datasheet, ComponentLink1URL=https://www.ti.com/lit/gpn/tusb4041i, Manufacturer Part Number=TUSB4041IPAP
U15: library part CMP-0000002330-2, "IC-EEPROM-2KBIT-M24C02-FDW6TP", Manufacturer=STMicroelectronics, ComponentLink1Description=Datasheet, ComponentLink1URL=https://www.st.com/content/ccc/resource/technical/document/datasheet/b0/d8/50/40/5a/85/49/6f/DM00071904.pdf/files/DM00071904.pdf/jcr:content/translations/en.DM00071904.pdf, Manufacturer Part Number=M24C02-FDW6TP
U16: library part CMP-0000003499-1, "IC-eFuse-5V-TPS25200DRVR", Manufacturer="Texas Instruments", ComponentLink1Description=Datasheet, ComponentLink1URL=https://www.ti.com/general/docs/suppproductinfo.tsp?distId=10&gotoUrl=https%3A%2F%2Fwww.ti.com%2Flit%2Fgpn%2Ftps25200, Manufacturer Part Number=TPS25200DRVR
U17 U18 U19 U20: library part CMP-0000003474-3, "IC-USB-CMD-ESD-PROTECT-ECMF2-40A100N6", Manufacturer=STMicroelectronics, ComponentLink1Description=Datasheet, ComponentLink1URL=https://www.st.com/resource/en/datasheet/ecmf2-40a100n6.pdf, Manufacturer Part Number=ECMF2-40A100N6
U21A U21B U21C: library part CMP-0000003484-2, "IC-DAC-DAC8881SRGET", Manufacturer="Texas Instruments", ComponentLink1Description=Datasheet, ComponentLink1URL=https://www.digikey.com/en/products/detail/texas-instruments/DAC8881SRGET/1739759, Manufacturer Part Number=DAC8881SRGET
U22A U22B U22C U26A U26B U26C: library part CMP-0000003487-3, "IC-OPAMP-DUAL-OPA2387DSGR", Manufacturer="Texas Instruments", ComponentLink1Description=Datasheet, ComponentLink1URL=https://www.ti.com/lit/ds/symlink/opa2387.pdf, Manufacturer Part Number=OPA2387DSGR, PartId=1
U23A U23B U23C: library part CMP-0000003485-3, "IC-DiffAmp-THS4536RUNR", Manufacturer="Texas Instruments", ComponentLink1Description=Datasheet, ComponentLink1URL=https://www.ti.com/lit/ds/symlink/ths4536.pdf, Manufacturer Part Number=THS4536RUNR
U24A U24B U24C: library part CMP-0000003515-3, "IC-ANALOGSWITCH-TMUX1111RSVR", Manufacturer="Texas Instruments", ComponentLink1Description=Datasheet, ComponentLink1URL=https://www.ti.com/general/docs/suppproductinfo.tsp?distId=10&gotoUrl=https%3A%2F%2Fwww.ti.com%2Flit%2Fgpn%2Ftmux1111, Manufacturer Part Number=TMUX1111RSVR
U25A U25B U25C: library part CMP-0000003488-2, "IC-VREF-1.25V-REF7012QDGKR", Manufacturer="Texas Instruments", ComponentLink1Description=Datasheet, ComponentLink1URL=https://www.ti.com/lit/ds/symlink/ref70.pdf, Manufacturer Part Number=REF7012QDGKR
Y1: library part CMP-00002-2, "XTAL-32.768kHz-10ppm-9pF-2.0x1.2", Load Capacitance=9pF, Manufacturer="Würth Elektronik", Manufacturer Part Number=830062558, Tolerance=10ppm, ComponentLink1Description=Datasheet, ComponentLink1URL=https://www.we-online.com/components/products/datasheet/830062558.pdf
Y2: library part CMP-00000-5, "XTAL-32MHz-10ppm-8pF-2.0x1.6", Load Capacitance=8pF, Manufacturer="Würth Elektronik", Manufacturer Part Number=830108212909, Tolerance=±10ppm, Stability=±15ppm
Y3: library part CMP-00287-2, "XTAL-24MHz-50ppm-20pF-5.0x3.2", Load Capacitance=20pF, Manufacturer="ECS Inc.", Manufacturer Part Number=ECS-240-20-30B-TR, Tolerance=±10ppm, Stability=±50ppm

## Via types
v1: diameter 0.5, hole 0.2, Top Layer to Bottom Layer, tented both sides, 1097 vias
v2: diameter 0.8, hole 0.4, Top Layer to Bottom Layer, tented both sides, 32 vias
v3: diameter 0.5, hole 0.2, Top Layer to Bottom Layer, 24 vias
v4: diameter 0.6, hole 0.3, Top Layer to Bottom Layer, 16 vias

## Nets (pads, with @x,y where several pads share a name; then routed paths per layer and width w, separated by ;. In a path a pad name is that pad's centre, name@x,y a point inside that pad or via, vN(x,y) a via of type N, cw(c..) or ccw(c..) an arc to the next point about the centre after c; other vN are vias at no path point)
AUTOENZ: R45.1 U12.13 | length 1.8
  Top Layer w0.25: v1(49.8,28.3) R45.1@50.425,28.3
  Bottom Layer w0.3: U12.13@48.65,28.3 v1(49.8,28.3)
CLK_32M_SOC_XTALI: C37.1 U6.B24 Y2.3 | length 4.1
  Bottom Layer w0.102: C37.1@40.035,35.225 40.055,35.225 40.264,35.016 40.264,34.986 40.575,34.675 40.575,33.776 Y2.3@40.826,33.525 ; Y2.3@40.876,33.574 Y2.3@41.213,33.238
  Bottom Layer w0.2: U6.B24@39.075,36.05 39.075,35.65 39.5,35.225 C37.1@40.035,35.225
CLK_32M_SOC_XTALO: C45.1 U6.A23 Y2.1 | length 2.3
  Bottom Layer w0.2: U6.A23@38.575,35.55 38.875,35.25 C45.1@38.875,34.59 39.51,34.59 39.888,34.213 Y2.1@39.938,34.213
DAC1_1V25_REFA: C119A.1 C120A.1 U21A.7 U21A.11 U25A.6 U25A.7 U26A.5 | length 19.1
  Layer 4 w0.2: v1(4.75,95.15) 4.75,95.125 5.95,93.925 8.925,93.925 10.42,95.42 v1(10.45,95.42) ; v1(5.425,88.025) 5,88.45 5,89.925 v1(5.425,90.35)
  Bottom Layer w0.2: U25A.7@4.75,93.8 v1(4.75,95.15) ; v1(5.425,88.025) U21A.7@6.55,88.025 ; v1(5.425,90.35) 5.75,90.025 U21A.11@6.55,90.025 ; U26A.5@9.975,95.35 9.975,95.37 10.025,95.42 v1(10.45,95.42)
  Bottom Layer w0.25: U25A.7@4.75,93.8 4.75,92.725 5.275,92.2 C119A.1@5.3,92.2 5.45,92.05 5.45,91.035 5.42,91.005 5.42,90.355 v1(5.425,90.35) ; U25A.6@5.4,93.8 5.408,93.793 C119A.1@5.408,92.2
DAC1_1V25_REFB: C119B.1 C120B.1 U21B.7 U21B.11 U25B.6 U25B.7 U26B.5 | length 19.2
  Layer 4 w0.2: v1(19.725,109.9) 20.15,110.325 21.625,110.325 v1(22.05,109.9) ; v1(26.85,110.575) 26.825,110.575 25.625,109.375 25.625,106.4 27.133,104.892 v1(27.133,104.875)
  Bottom Layer w0.2: U21B.7@19.725,108.775 v1(19.725,109.9) ; U21B.11@21.725,108.775 21.725,109.575 v1(22.05,109.9) ; U25B.7@25.5,110.575 v1(26.85,110.575) ; U26B.5@27.05,105.35 27.083,105.35 27.133,105.3 v1(27.133,104.875)
  Bottom Layer w0.25: v1(22.05,109.9) 22.055,109.905 22.705,109.905 22.735,109.875 23.75,109.875 C119B.1@23.9,110.025 23.9,110.05 24.425,110.575 U25B.7@25.5,110.575 ; C119B.1@23.9,109.917 25.493,109.917 U25B.6@25.5,109.925
DAC1_1V25_REFC: C119C.1 C120C.1 U21C.7 U21C.11 U25C.6 U25C.7 U26C.5 | length 19.1
  Layer 4 w0.2: v1(49.575,77.025) 49.575,77 50.775,75.8 53.75,75.8 v1(55.275,77.325) ; v1(50.25,72.225) 49.825,71.8 49.825,70.4 v1(50.325,69.9)
  Bottom Layer w0.2: U25C.7@49.575,75.675 v1(49.575,77.025) ; v1(50.25,72.225) 50.575,71.9 U21C.11@51.375,71.9 ; v1(50.325,69.9) U21C.7@51.375,69.9 ; U26C.5@54.8,77.225 54.8,77.275 54.85,77.325 v1@55.278,77.325
  Bottom Layer w0.25: U25C.7@49.575,75.675 49.575,74.6 50.1,74.075 50.125,74.075 50.275,73.925 50.275,72.91 50.245,72.88 50.245,72.23 v1(50.25,72.225) ; U25C.6@50.225,75.675 50.233,75.668 C119C.1@50.233,74.075
DAC1_CTRL.nCS_ISO: U7.13 U21A.19 | length 38.9
  Layer 4 w0.12: v1(11.225,91.325) 10.85,90.95 10.85,80.625 11.65,79.825 v1(11.65,77.45)
  Bottom Layer w0.12: U7.13@6.88,56.05 6.88,72.68 v1(11.65,77.45)
  Bottom Layer w0.15: U21A.19@10.5,90.525 10.642,90.525 10.702,90.585 10.702,90.802 v1(11.225,91.325)
DAC1_CTRL.nLDAC_ISO: U7.12 U21A.3 | length 35
  Bottom Layer w0.12: U7.12@5.61,56.05 5.625,56.065 5.625,72.4 11.725,78.5 11.725,83.05 8.775,86 U21A.3@8.775,87.3
DAC1_CTRL.nRST_ISO: U7.11 U21A.17 | length 40.7
  Layer 4 w0.12: v1(10.3,79.325) 9.8,79.825 9.8,91.379 10.396,91.975 v1(10.45,91.975)
  Bottom Layer w0.12: U7.11@4.34,56.05 4.34,72.065 10.3,78.025 v1(10.3,79.325)
  Bottom Layer w0.15: U21A.17@9.275,91.25 9.288,91.263 9.288,91.738 9.525,91.975 v1(10.45,91.975) v1@10.522,91.975
DAC1_CTRL.PDN_ISO: R18A.1 U7.10 U21A.18 | length 45.3
  Top Layer w0.15: v1(13.65,94.525) R18A.1@13.65,95.125
  Layer 4 w0.12: v1(9.525,78.3) 10.5,78.3 11.15,78.95 11.15,79.475 10.325,80.3 v1(10.325,91.175) 10.325,91.187 13.65,94.512 v1(13.65,94.525)
  Bottom Layer w0.12: U7.10@3.07,56.05 3.07,71.845 v1(9.525,78.3)
  Bottom Layer w0.15: U21A.18@9.775,91.25 9.775,91.235 9.835,91.175 v1(10.325,91.175)
DAC1_nCS: U6.K2 U7.4 | length 31.5
  Bottom Layer w0.076: 32.275,38.3 32.875,38.3
  Bottom Layer w0.12: U7.4@6.88,46.55 6.88,43.295 8.025,42.15 25.125,42.15 28.975,38.3 32.275,38.3 ; 32.875,38.3 U6.K2@33.075,38.3
DAC1_nLDAC: U6.J1 U7.5 | length 32.4
  Bottom Layer w0.12: U7.5@5.61,46.55 5.61,43.315 7.125,41.8 25,41.8 28.75,38.05 U6.J1@32.575,38.05
DAC1_nRST: U6.A8 U7.6 | length 42.3
  Layer 4 w0.12: v1@4.253,45.272 7.2,42.325 25.225,42.325 27.4,40.15 27.4,37.2 32.325,32.275 v1(33.65,32.275)
  Bottom Layer w0.12: U7.6@4.34,46.55 U7.6@4.35,46.54 ; v1(33.65,32.275) 34.5,32.275 34.825,32.6 34.825,35.3 U6.A8@34.575,35.55
  Bottom Layer w0.15: v1(4.35,45.175) U7.6@4.35,46.54
DAC1_PDN: U6.A10 U7.7 | length 44.2
  Layer 4 w0.12: v1@3.053,45.197 6.275,41.975 25.075,41.975 27.05,40 27.05,37.075 v1(32.375,31.75)
  Bottom Layer w0.12: U7.7@3.07,46.55 U7.7@3.075,46.545 ; v1(32.375,31.75) 34.525,31.75 35.075,32.3 35.075,34.475 U6.A10@35.075,35.55
  Bottom Layer w0.15: v1(3.075,45.175) U7.7@3.075,46.545
DAC1_SPI_SDOA: TP29A.1 U21A.23 | length 3.4
  Bottom Layer w0.15: U21A.23@10.5,88.525 13.3,88.525 TP29A.1@13.75,88.975
DAC1_SPI_SDOB: TP29B.1 U21B.23 | length 3.4
  Bottom Layer w0.15: U21B.23@20.225,104.825 20.225,102.025 TP29B.1@20.675,101.575
DAC1_SPI_SDOC: TP29C.1 U21C.23 | length 3.4
  Bottom Layer w0.15: U21C.23@55.325,70.4 58.125,70.4 TP29C.1@58.575,70.85
DAC1_VOUTA: R77A.1 TP32A.1 U21A.8 U21A.9 | length 16.2
  Layer 4 w0.2: v1(5.5,88.775) 11.1,94.375 v1(11.1,98.475)
  Bottom Layer w0.15: TP32A.1@4.525,88.425 4.538,88.438 5.163,88.438 v1@5.499,88.774 ; U21A.8@6.55,88.525 5.751,88.525 5.501,88.774 5.751,89.025 U21A.9@6.55,89.025
  Bottom Layer w0.2: R77A.1@10.375,98.475 v1(11.1,98.475)
DAC1_VOUTB: R77B.1 TP32B.1 U21B.8 U21B.9 | length 16.2
  Layer 4 w0.2: v1(20.475,109.825) 26.075,104.225 v1(30.175,104.225)
  Bottom Layer w0.15: TP32B.1@20.125,110.8 20.137,110.787 20.137,110.162 v1@20.474,109.826 ; U21B.8@20.225,108.775 20.225,109.574 20.474,109.824 20.725,109.574 U21B.9@20.725,108.775
  Bottom Layer w0.2: v1(30.175,104.225) R77B.1@30.175,104.95
DAC1_VOUTC: R77C.1 TP32C.1 U21C.8 U21C.9 | length 16.2
  Layer 4 w0.2: v1(50.35,70.65) 55.925,76.225 v1(55.925,80.35)
  Bottom Layer w0.15: TP32C.1@49.35,70.3 49.475,70.3 49.856,70.681 50.319,70.681 v1(50.35,70.65) ; U21C.8@51.375,70.4 50.627,70.4 v1@50.377,70.65 ; U21C.9@51.375,70.9 50.627,70.9 v1@50.377,70.65 ; v1(50.35,70.65) v1@50.377,70.65 ; v1(50.35,70.65) v1@50.377,70.65
  Bottom Layer w0.2: R77C.1@55.2,80.35 v1(55.925,80.35)
DAC2_CTRL.nCS_ISO: U8.15 U21B.19 | length 55.6
  Layer 4 w0.12: v1(20.75,100.325) 21.625,100.325 22.975,101.675 v1(22.975,103.925) ; v1(20.925,57.375) 16.975,61.325 16.975,89.95 22.525,95.5 v1(22.525,97.225)
  Bottom Layer w0.12: v1(20.75,100.325) 20.75,99 v1(22.525,97.225) ; U8.15@21.325,56.055 U8.15@21.33,56.05 ; U21B.19@22.225,104.825 22.225,104.699 22.299,104.625 22.7,104.625 22.975,104.35 v1(22.975,103.925)
  Bottom Layer w0.2: v1(20.925,57.375) 20.982,57.318 20.982,57.048 21.325,56.705 U8.15@21.325,56.055
DAC2_CTRL.nLDAC_ISO: U8.14 U21B.3 | length 53.7
  Layer 4 w0.12: v1(16.85,104.2) 16.862,104.212 16.862,106.137 v1(16.875,106.15)
  Bottom Layer w0.12: v1@16.856,104.194 16.856,61.894 20.06,58.69 U8.14@20.06,56.05 ; v1(16.875,106.15) 17.275,106.55 U21B.3@19,106.55
DAC2_CTRL.nRST_ISO: U8.13 U21B.17 | length 57.8
  Layer 4 w0.12: v1(18.8,57.425) 16.475,59.75 16.475,89.95 21.975,95.45 v1(21.975,96.5) ; v1(20.075,100.975) 20.075,103.975 20.625,104.525 23.225,104.525 v1(23.8,105.1)
  Bottom Layer w0.12: v1(20.075,100.975) 20.075,98.4 v1(21.975,96.5)
  Bottom Layer w0.15: U21B.17@22.95,106.05 23.475,106.05 23.8,105.725 v1(23.8,105.1)
  Bottom Layer w0.2: U8.13@18.8,56.025 v1(18.8,57.425)
DAC2_CTRL.PDN_ISO: R18B.1 U8.12 U21B.18 | length 62.5
  Top Layer w0.12: v1(22.975,105.05) 24.925,103.1 24.925,102.05 25.3,101.675 v1(26.15,101.675)
  Top Layer w0.15: v1(26.15,101.675) R18B.1@26.838,101.675
  Layer 4 w0.12: v1(17.525,57.425) 15.975,58.975 15.975,89.95 21.375,95.35 v1(21.375,95.95) ; v1(19.125,100.9) 19.125,104.075 20.1,105.05 v1(22.975,105.05)
  Bottom Layer w0.12: v1(19.125,100.9) 19.125,98.2 v1(21.375,95.95)
  Bottom Layer w0.15: U21B.18@22.95,105.55 22.975,105.525 v1(22.975,105.05)
  Bottom Layer w0.2: U8.12@17.525,56.025 v1(17.525,57.425)
DAC2_nCS: U6.AD16 U8.2 | length 21.3
  Layer 4 w0.12: v1(21.325,45.225) 22.55,46.45 v1(36.2,46.45)
  Bottom Layer w0.12: v1(21.325,45.225) 21.325,46.545 U8.2@21.33,46.55 ; v1(36.2,46.45) 36.575,46.075 U6.AD16@36.575,42.05
DAC2_nLDAC: U6.AC19 U8.3 | length 27
  Layer 4 w0.12: v1(20.05,45.25) 21.75,46.95 38.35,46.95 v1(39.025,46.275)
  Bottom Layer w0.076: 37.325,41.75 37.325,42.35
  Bottom Layer w0.12: v1(20.05,45.25) 20.05,46.54 U8.3@20.06,46.55 ; U6.AC19@37.325,41.55 37.325,41.75 ; 37.325,42.35 37.325,45.125 38.475,46.275 v1(39.025,46.275)
DAC2_nRST: U6.R1 U8.4 | length 18.3
  Bottom Layer w0.12: U8.4@18.79,46.55 18.79,44.11 19.35,43.55 25.625,43.55 29.895,39.28 31.755,39.28 32.025,39.55 U6.R1@32.575,39.55
DAC2_PDN: U6.P2 U8.5 | length 20.1
  Bottom Layer w0.076: 32.275,39.3 32.875,39.3
  Bottom Layer w0.12: U8.5@17.52,46.55 17.55,46.52 17.55,44.275 18.625,43.2 25.5,43.2 29.66,39.04 31.865,39.04 32.125,39.3 32.275,39.3 ; 32.875,39.3 U6.P2@33.075,39.3
DAC3_CTRL.nCS_ISO: U8.11 U21C.19 | length 73.1
  Top Layer w0.12: v1(14.525,73.788) 14.531,73.781 18.269,73.781 v1(18.275,73.775)
  Layer 4 w0.12: v1(14.525,73.788) 14.537,73.788 15.475,72.85 15.475,58.2 v1(16.25,57.425) ; v1(18.275,73.775) 20.6,73.775 23.65,76.825 44.725,76.825 46,75.55 46,70.375 49.075,67.3 54.925,67.3 55.325,67.7 v1(55.325,72.875)
  Bottom Layer w0.15: U21C.19@55.325,72.4 v1@55.325,72.65
  Bottom Layer w0.2: U8.11@16.25,56.05 v1(16.25,57.425)
DAC3_CTRL.nLDAC_ISO: U8.10 U21C.3 | length 69.3
  Top Layer w0.12: v1(12.825,74.275) 12.838,74.287 19.062,74.287 v1(19.075,74.3)
  Layer 4 w0.12: v1(12.825,74.275) 14.975,72.125 v1(14.975,57.425) ; v1(19.075,74.3) 20.65,74.3 23.525,77.175 44.875,77.175 46.35,75.7 46.35,70.525 48.275,68.6 52.825,68.6 53.6,67.825 v1(53.6,67.8)
  Bottom Layer w0.12: v1(53.6,67.8) U21C.3@53.6,69.175
  Bottom Layer w0.2: U8.10@14.975,56.155 v1(14.975,57.425)
DAC3_CTRL.nRST_ISO: U9.15 U21C.17 | length 26.9
  Top Layer w0.12: v1(55,73.85) 58.525,73.85 60.05,72.325 60.05,60.125 57.45,57.525 v1(55.05,57.525)
  Bottom Layer w0.15: U21C.17@54.1,73.125 54.1,73.65 54.3,73.85 v1(55,73.85)
  Bottom Layer w0.2: U9.15@55.04,56.06 55.05,56.07 v1(55.05,57.525)
  Bottom Layer w0.3: U9.15@55.03,56.05 U9.15@55.04,56.06
DAC3_CTRL.PDN_ISO: R18C.1 U9.14 U21C.18 | length 31.2
  Top Layer w0.12: v1(53.775,58.05) 55.375,58.05 56.075,58.75 58.175,58.75 59.7,60.275 59.7,72.175 58.55,73.325 v1(56.025,73.325)
  Top Layer w0.15: v1(58.475,76.35) R18C.1@58.475,77.013
  Layer 4 w0.12: v1(56.025,73.325) 58.475,75.775 v1(58.475,76.35)
  Bottom Layer w0.15: U21C.18@54.6,73.125 54.6,73.265 54.66,73.325 v1(56.025,73.325)
  Bottom Layer w0.2: U9.14@53.755,56.055 53.775,56.075 v1(53.775,58.05)
  Bottom Layer w0.3: U9.14@53.755,56.055 U9.14@53.76,56.05
DAC3_nCS: U6.N1 U8.6 | length 20.9
  Bottom Layer w0.12: U8.6@16.25,46.55 16.25,44.35 17.75,42.85 25.375,42.85 29.425,38.8 32.296,38.8 32.546,39.05 U6.N1@32.575,39.05
DAC3_nLDAC: U6.L1 U8.7 | length 22.2
  Bottom Layer w0.12: U8.7@14.98,46.55 14.98,44.37 16.85,42.5 25.25,42.5 29.2,38.55 U6.L1@32.575,38.55
DAC3_nRST: U6.AD20 U9.2 | length 22.4
  Layer 4 w0.12: v1(39.575,45.5) 54.475,45.5 v1(55.05,44.925)
  Bottom Layer w0.12: U6.AD20@37.575,42.05 37.575,44.75 38.325,45.5 v1(39.575,45.5) ; U9.2@55.025,46.545 55.05,46.52 v1(55.05,44.925)
DAC3_PDN: U6.AC21 U9.3 | length 20.7
  Layer 4 w0.12: v1(39.025,44.925) v1(53.75,44.925)
  Bottom Layer w0.076: 37.825,41.75 37.825,42.35
  Bottom Layer w0.12: U6.AC21@37.825,41.55 37.825,41.75 ; 37.825,42.35 37.825,44.525 38.225,44.925 v1(39.025,44.925) ; v1(53.75,44.925) 53.75,46.54 U9.3@53.76,46.55
DAC_SPI.MOSI_ISO: U7.14 U21A.2 U21B.2 U21C.2 | length 116.2
  Top Layer w0.12: v1(13.825,78.475) 13.825,78.425 15.4,76.85 v1(18.475,76.85)
  Layer 4 w0.12: v1(11.6,76.25) v1(13.825,78.475) ; v1(18.475,76.85) 19.15,77.525 45.025,77.525 46.7,75.85 46.7,72.05 49.8,68.95 53.5,68.95 v1(54.1,68.35)
  Bottom Layer w0.12: U7.14@8.15,56.05 8.15,72.8 v1(11.6,76.25) 12.4,77.05 12.4,82.875 9.275,86 U21A.2@9.275,87.3 ; v1(13.825,78.475) 13.838,78.475 16,80.637 16,104.6 17.45,106.05 U21B.2@19,106.05 ; v1(54.1,68.35) U21C.2@54.1,69.175
DAC_SPI.SCLK_ISO: U7.15 U21A.1 U21B.1 U21C.1 | length 117.7
  Top Layer w0.12: v1(14.65,76.15) v1(17.825,76.15)
  Layer 4 w0.12: v1(17.825,76.15) 17.825,77.125 18.575,77.875 45.2,77.875 47.05,76.025 47.05,72.175 49.925,69.3 54.125,69.3 54.6,68.825 v1(54.6,67.8)
  Bottom Layer w0.12: U7.15@9.42,56.05 9.42,73.12 v1(13.05,76.75) ; U21A.1@9.775,87.3 9.775,86 13.05,82.725 v1(13.05,76.75) ; U21B.1@19,105.55 17.45,105.55 16.42,104.52 16.42,77.92 v1(14.65,76.15) 13.65,76.15 v1(13.05,76.75) ; v1(54.6,67.8) U21C.1@54.6,69.175
DAC_SPI_MOSI: TP11.1 U6.AD10 U7.3 | length 36.9
  Layer 4 w0.12: v1(8.15,45.175) 10.3,43.025 23.35,43.025 26,45.675 32.075,45.675 32.875,44.875 34.75,44.875 v1(35.733,45.858)
  Bottom Layer w0.12: U6.AD10@35.075,42.05 35.075,42.225 34.525,42.775 34.525,44.65 v1(35.733,45.858)
  Bottom Layer w0.15: TP11.1@8.15,44.45 v1(8.15,45.175) U7.3@8.15,46.55
DAC_SPI_SCLK: TP10.1 U6.AC11 U7.2 | length 35.5
  Layer 4 w0.12: v1(9.4,43.15) 9.875,42.675 23.475,42.675 26.125,45.325 31.925,45.325 32.725,44.525 35.038,44.525 v1(35.594,45.081)
  Bottom Layer w0.076: 35.325,41.75 35.325,42.35
  Bottom Layer w0.12: U6.AC11@35.325,41.55 35.325,41.75 ; 35.325,42.35 34.825,42.85 34.825,44.312 v1(35.594,45.081)
  Bottom Layer w0.15: v1(9.4,43.15) TP10.1@9.4,44.575 ; U7.2@9.42,46.55 9.4,46.53 9.4,44.65 TP10.1@9.425,44.625
DCC: L4.1 U6.B3 | length 1.9
  Bottom Layer w0.25: L4.1@32.425,34.475 32.425,35.15 U6.B3@33.325,36.05
DCC_L: L3.2 L4.2 | length 1.3
  Bottom Layer w0.25: L4.2@32.275,33.225 L4.2@32.48,33.43 ; L4.2@32.58,33.43 33,33.43 L3.2@33.41,33.84 ; L3.2@33.31,33.84 L3.2@33.325,33.84
DEC1: C48.1 U6.C1 | length 1
  Bottom Layer w0.25: C48.1@31.615,36.55 U6.C1@32.575,36.55
DEC3: C49.1 U6.D23 | length 1.7
  Bottom Layer w0.25: U6.D23@38.575,36.8 38.582,36.8 38.857,36.525 39.735,36.525 C49.1@40.035,36.225
DEC4_6: C46.1 C47.1 L3.1 U6.B5 U6.E24 | length 10.7
  Layer 4 w0.3: v1(34.2,35.15) 37.125,35.15 v1(39.525,37.55)
  Bottom Layer w0.25: L3.1@33.375,34.655 33.375,35.17 33.82,35.615 33.82,36.045 U6.B5@33.825,36.05 ; L3.1@33.475,34.65 L3.1@33.563,34.563 ; 33.663,34.563 C46.1@34.275,34.563 ; C46.1@34.2,34.565 C46.1@34.275,34.49 ; U6.E24@39.075,37.05 v1@39.525,37.5 ; v1@39.525,37.507 v1(39.525,37.55) 39.525,37.54 40.015,37.05 C47.1@40.035,37.05
  Bottom Layer w0.3: C46.1@34.2,34.565 v1(34.2,35.15)
DEC5: C50.1 U6.N24 | length 1
  Bottom Layer w0.25: U6.N24@39.075,39.05 C50.1@40.05,39.05
DECUSB: C51.1 U6.AC5 | length 3.8
  Bottom Layer w0.2: 32.8,41.675 33.68,41.675 33.805,41.55 U6.AC5@33.825,41.55
  Bottom Layer w0.25: C51.1@31.375,43.6 31.65,43.325 31.675,43.325 32.125,42.875 32.125,42.025 32.475,41.675 32.8,41.675
DN2_VBUS: C53.1 C57.1 FB4.1 TP16.1 U11.6 | length 1.7
  Top Layer w0.2: v1(56.875,6.35) FB4.1@57.75,6.35
  Bottom Layer w0.2: TP16.1@56.05,6.35 v1(56.875,6.35)
DN3_VBUS: C59.1 C61.1 FB5.1 TP19.1 U13.6 | length 1.7
  Top Layer w0.2: v1(39.85,6.325) FB5.1@40.725,6.325
  Bottom Layer w0.2: TP19.1@39.025,6.325 v1(39.85,6.325)
DN4_VBUS: C62.1 C64.1 FB6.1 TP22.1 U14.6 | length 1.7
  Top Layer w0.2: v1(22.625,6.325) FB6.1@23.5,6.325